# Altium PCB 3MotorDrivers.PcbDoc
Units mil, origin at the board's own origin, x right, y up, seen from the top; angles counter-clockwise.
Board outline 1098.88 x 2700 mil, 2 copper layers (Top Layer, Bottom Layer); 16 components, 38 nets, 94 pads, 6 vias.
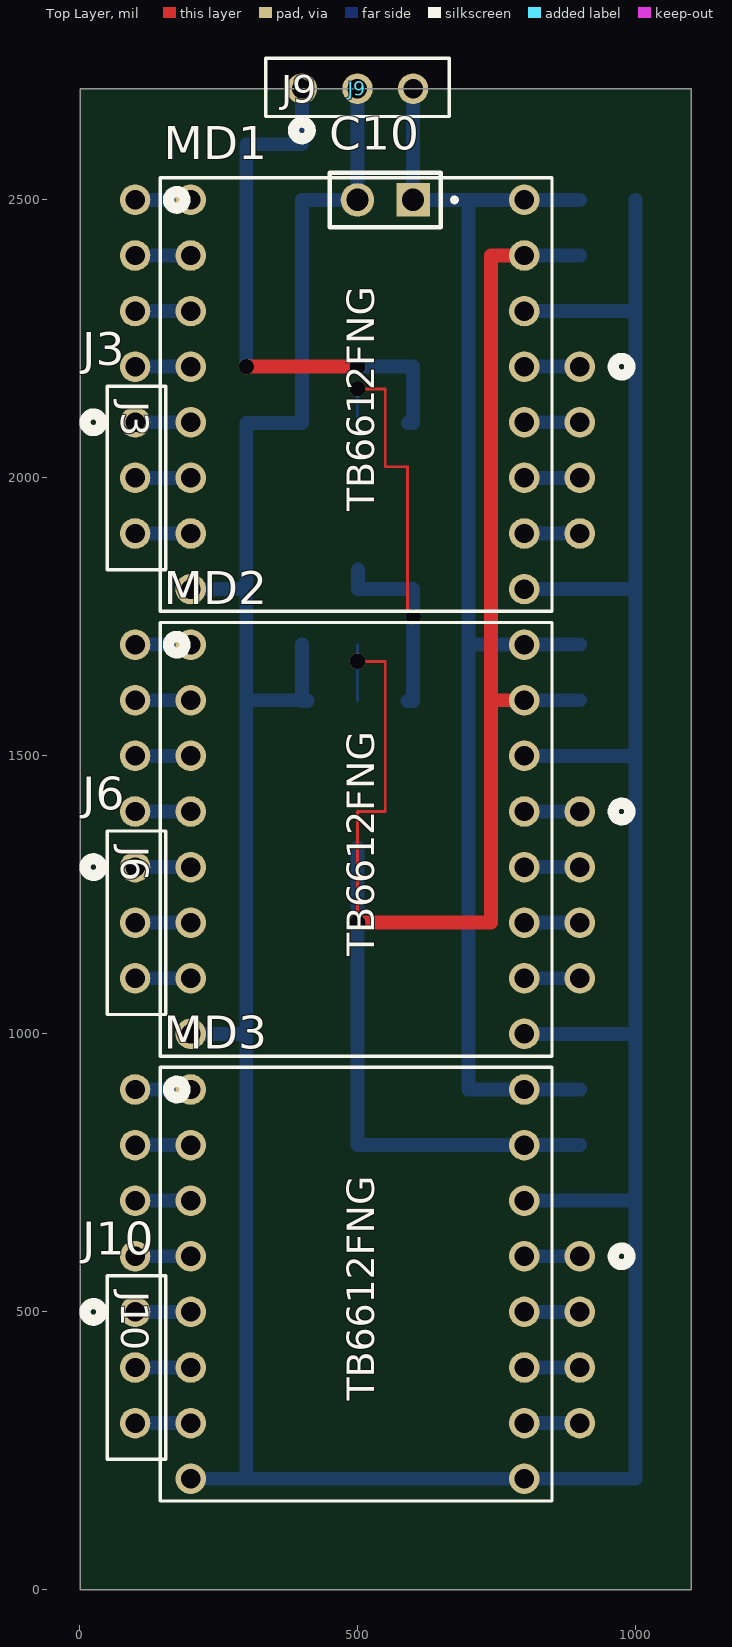
[diagram p0: Top Layer view]
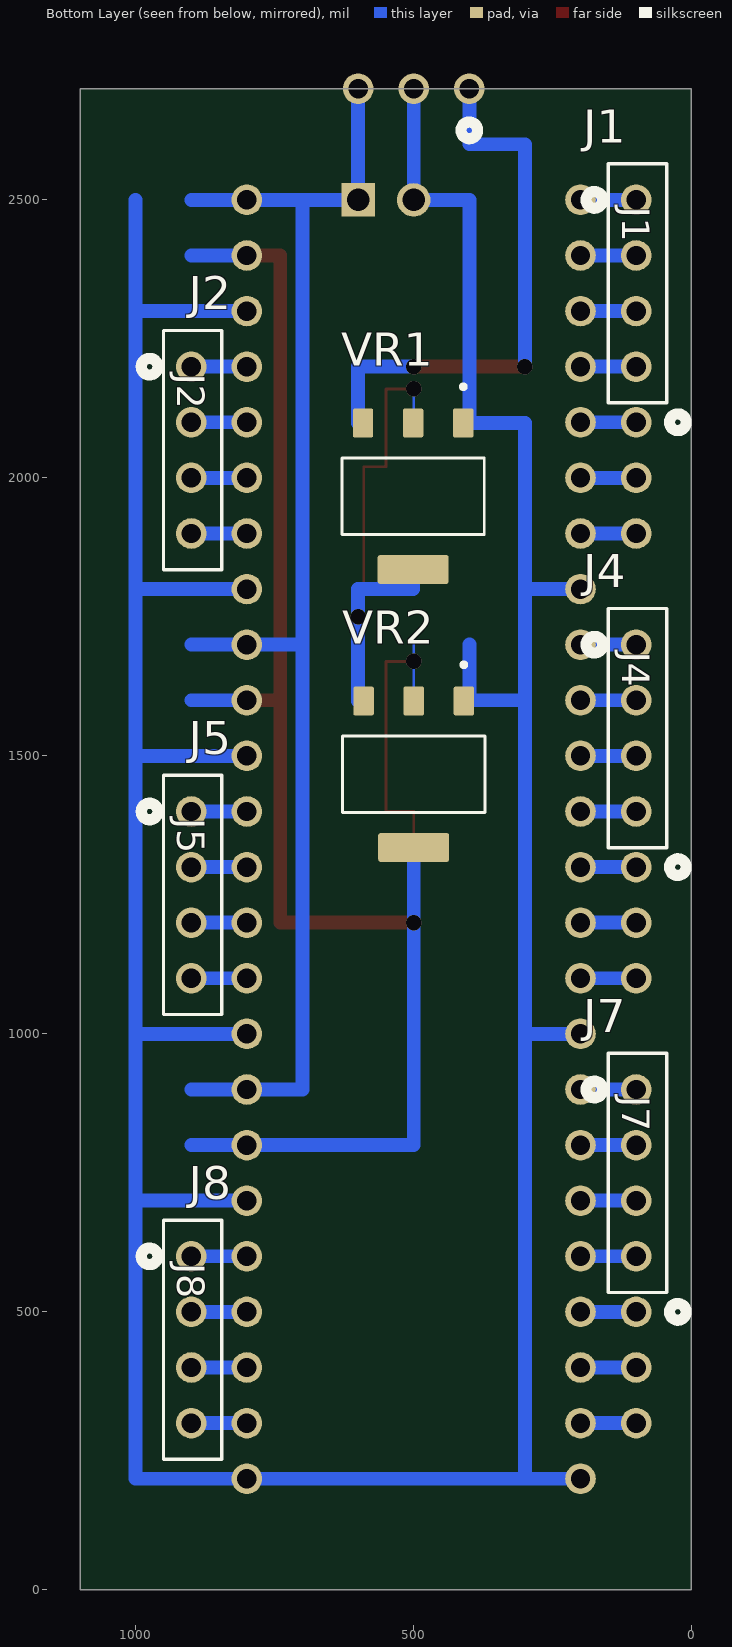
[diagram p1: Bottom Layer view, seen from below]
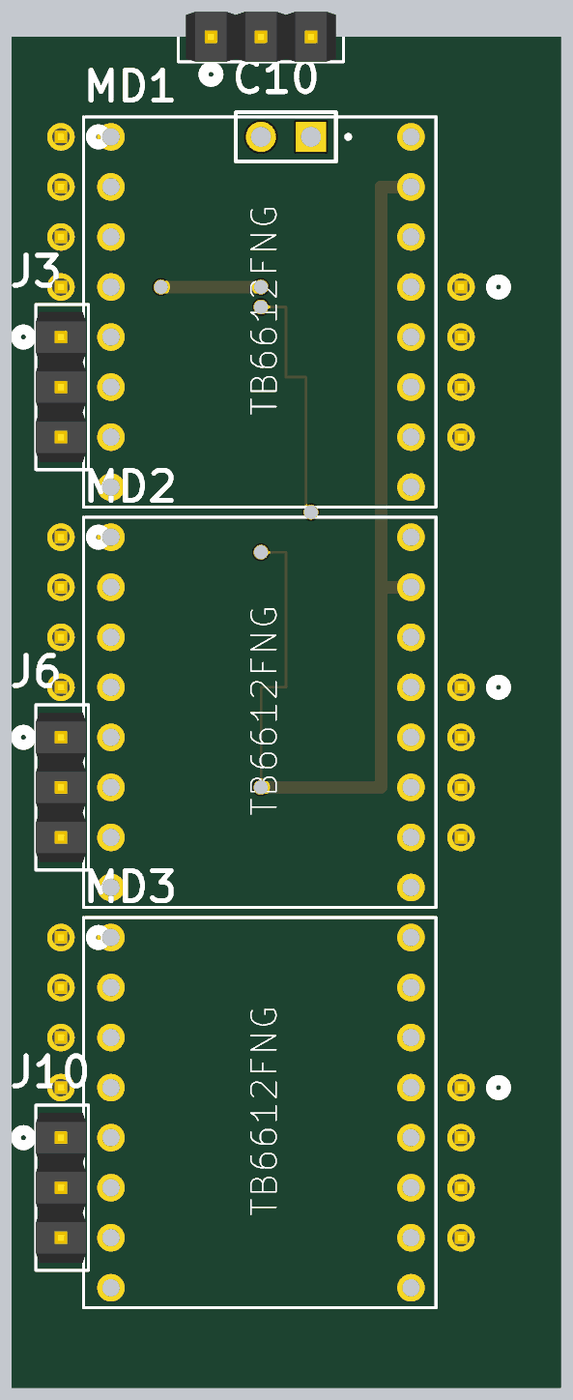
[diagram p2: 3D render of the assembled board from above, using the file's embedded part models]
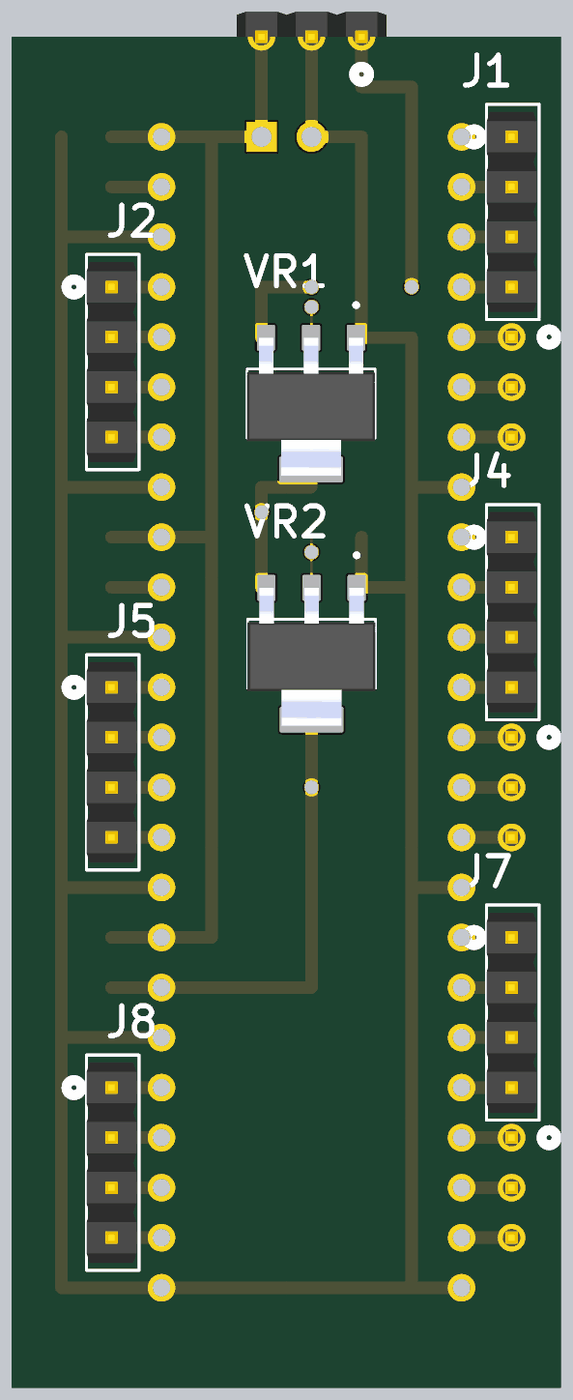
[diagram p3: 3D render of the assembled board from below, using the file's embedded part models]

## Layer stack, top to bottom
Top Solder: solder mask 0.4, Solder Resist, Dk 3.5
Top Layer: signal copper 1.4
Dielectric 1: dielectric 12.6, FR-4, Dk 4.8
Bottom Layer: signal copper 1.4
Bottom Solder: solder mask 0.4, Solder Resist, Dk 3.5

## Board outline
1.12,0 1.12,2700 1100,2700 1100,0

## Design rules (kind name [scope] priority, off if disabled: settings)
Clearance [All] p1: gap=3.94 ignorepadtopadclearanceinfootprint=FALSE
PolygonConnect [All] p1: connectstyle=Relief reliefconductorwidth=10 reliefentries=4 polygonreliefangle="90 Angle" airgapwidth=10
RoutingVias [All] p1: holewidth=28 width=50 viastyle="Through Hole" minholewidth=28 minwidth=50 maxholewidth=28 maxwidth=50
SolderMaskExpansion [All] p1: expansion=4 istentingtop=FALSE
SupplyNets "Schematic Supply Nets_1" [InNet('GND')] p1: voltage=0.000
SupplyNets "Schematic Supply Nets" [InNet('6V5')] p2: voltage=0.000
Width [All] p1: maxlimit=25 minlimit=5 preferedwidth=10
30 further rules are at their usual default settings.

## Components (designator, comment, footprint, x,y, rotation, side; value= is the part's Value field where it differs from the comment)
C10 "100uF" 47nF 550,2500 r0 top
J1 "HTSW-104-23-T-S" "4 POS" 100,2400 r270 bottom
J2 "HTSW-104-23-T-S" "4 POS" 900,2100 r270 bottom
J3 "3 Male Headers" "3 POS" 100,2000 r270 top
J4 "HTSW-104-23-T-S" "4 POS" 100,1600 r270 bottom
J5 "HTSW-104-23-T-S" "4 POS" 900,1300 r270 bottom
J6 "3 Male Headers" "3 POS" 100,1200 r270 top
J7 "HTSW-104-23-T-S" "4 POS" 100,800 r270 bottom
J8 "HTSW-104-23-T-S" "4 POS" 900,500 r270 bottom
J9 "3 Male Headers" "3 POS" 500,2700 r0 top
J10 "3 Male Headers" "3 POS" 100,400 r270 top
MD1 "TB6612FNG" TB6612FNG 200,2000 r0 top
MD2 "TB6612FNG" TB6612FNG 200,1200 r0 top
MD3 "TB6612FNG" TB6612FNG 200,400 r0 top
VR1 "5V" 3V3 501,1967 r270 bottom
VR2 "3V3" 3V3 500,1467 r270 bottom

## Footprints (in the part's own frame and the unit in brackets; to place one, negate y for a bottom-side part, rotate by r counter-clockwise, add the part's x,y. Pads: shape width x height; smd on the part's side, far side on the other; paste and mask are expansions set on the pad)
"3 POS" [mil]
  round 55 hole 35 paste-99999 mask+0: 1(-100,0) 2(0,0) 3(100,0)
  silkscreen extent -165,-90 165,55, body extent -150,-50 150,50, height 500
3V3 [mm]
  rrect15% 1.31x0.93 smd: 1(-3.345,2.29) 2(-3.345,0) 3(-3.345,-2.29)
  rrect15% 1.31x3.24 smd: 4(3.345,0)
  silkscreen extent -5.1,-3.25 1.75,3.25, body extent -3.34,-3.25 3.65,3.25, height 1.8
"4 POS" [mil]
  round 55 hole 35 paste-99999 mask+0: 1(-100,0) 2(0,0) 3(100,0) 4(200,0)
  silkscreen extent -165,-90 265,55, body extent -150,-50 250,50, height 500
47nF [mm]
  round 1.53 hole 1.02: 1(-1.27,0)
  rect 1.53x1.53 / inner round 1.53 / far side rect 1.53x1.53 hole 1.02: 2(1.27,0)
  silkscreen extent -2.54,-1.24 3.26,1.24
TB6612FNG [mil]
  round 55 hole 35 paste-99999 mask+0: 1(0,500) 2(0,400) 3(0,300) 4(0,200) 5(0,100) 6(0,0) 7(0,-100) 8(0,-200) 9(600,500) 10(600,400) 11(600,300) 12(600,200) 13(600,100) 14(600,0) 15(600,-100) 16(600,-200)
  silkscreen extent -55,-240 650,540

## Part data
C10: "Pin Header, Board-to-Board, Wire-to-Board, 2.54 mm, 1 Rows, 2 Contacts, Through Hole, HTSW Series", Manufacturer=Samtec, Manufacturer Lifecycle Status=PRODUCTION, Manufacturer Part Number=HTSW-102-16-T-S, Category="Board to Board Connectors", ComponentLink1Description=https://datasheet.octopart.com:443/HTSW-102-16-T-S-Samtec-datasheet-97084101.pdf?src-supplier=Samtec, ComponentLink1URL=https://datasheet.octopart.com:443/HTSW-102-16-T-S-Samtec-datasheet-97084101.pdf?src-supplier=Samtec, ComponentLink2Description=https://sigma.octopart.com:443/14433675/technical_drawing/Samtec-HTSW-102-16-T-S.pdf?src-supplier=Samtec, ComponentLink2URL=https://sigma.octopart.com:443/14433675/technical_drawing/Samtec-HTSW-102-16-T-S.pdf?src-supplier=Samtec, ComponentLink3Description=https://datasheet.octopart.com:443/HTSW-102-16-T-S-Samtec-datasheet-150856372.pdf?src-supplier=Sager+Electronics, ComponentLink3URL=https://datasheet.octopart.com:443/HTSW-102-16-T-S-Samtec-datasheet-150856372.pdf?src-supplier=Sager+Electronics, ComponentLink4Description=https://datasheet.octopart.com:443/HTSW-102-16-T-S-Samtec-datasheet-151455181.pdf?src-supplier=Sager+Electronics, ComponentLink4URL=https://datasheet.octopart.com:443/HTSW-102-16-T-S-Samtec-datasheet-151455181.pdf?src-supplier=Sager+Electronics, ComponentLink5Description=https://datasheet.octopart.com:443/HTSW-102-16-T-S-Samtec-datasheet-136646178.pdf?src-supplier=Electro+Sonic, ComponentLink5URL=https://datasheet.octopart.com:443/HTSW-102-16-T-S-Samtec-datasheet-136646178.pdf?src-supplier=Electro+Sonic, ComponentLink6Description=https://datasheet.octopart.com:443/HTSW-102-16-T-S-Samtec-datasheet-62107121.pdf?src-supplier=Farnell, ComponentLink6URL=https://datasheet.octopart.com:443/HTSW-102-16-T-S-Samtec-datasheet-62107121.pdf?src-supplier=Farnell, ComponentLink7Description=https://datasheet.octopart.com:443/HTSW-102-16-T-S-Samtec-datasheet-180249195.pdf?src-supplier=JRH+Electronics, ComponentLink7URL=https://datasheet.octopart.com:443/HTSW-102-16-T-S-Samtec-datasheet-180249195.pdf?src-supplier=JRH+Electronics, ComponentLink8Description=https://datasheet.octopart.com/HTSW-102-16-T-S-Samtec-datasheet-86818365.pdf, ComponentLink8URL=https://datasheet.octopart.com/HTSW-102-16-T-S-Samtec-datasheet-86818365.pdf, ComponentLink9Description=https://datasheet.octopart.com:443/HTSW-102-16-T-S-Samtec-datasheet-21214457.pdf?src-supplier=Newark, ComponentLink9URL=https://datasheet.octopart.com:443/HTSW-102-16-T-S-Samtec-datasheet-21214457.pdf?src-supplier=Newark, Contact Material=Bronze, Contact Plating=Tin, Gender=Male, Lead Pitch=2.54mm, Lifecycle Status=Production, Mounting Technology="Through Hole", Number of Contacts=2, Number of Rows=1, Packaging=Bulk, Pitch=2.54mm, Pricing="1=0.1485, 1000=0.06895, 5000=0.0494, 10000=0.0491, 20000=0.04881 (USD)", Radiation Hardening=No, REACH SVHC=No, RoHS=Compliant, Stock=2347, Supplier=Avnet, Supplier Part Number=HTSW-102-16-T-S, Termination=Solder
J1 J2 J4 J5 J7 J8: library part "4 POS", "4POS CONN HEADER VERT  2.54MM", Manufacturer=Samtec, Manufacturer Lifecycle Status=PRODUCTION, Supplier Part Number=612-HTSW-104-23-T-S-ND, Category="Board to Board Connectors", ComponentLink1Description=https://datasheet.octopart.com:443/HTSW-104-23-T-S-Samtec-datasheet-97084101.pdf?src-supplier=Samtec, ComponentLink1URL=https://datasheet.octopart.com:443/HTSW-104-23-T-S-Samtec-datasheet-97084101.pdf?src-supplier=Samtec, ComponentLink2Description=https://sigma.octopart.com:443/14433675/technical_drawing/Samtec-HTSW-104-23-T-S.pdf?src-supplier=Samtec, ComponentLink2URL=https://sigma.octopart.com:443/14433675/technical_drawing/Samtec-HTSW-104-23-T-S.pdf?src-supplier=Samtec, ComponentLink3Description=https://datasheet.octopart.com:443/HTSW-104-23-T-S-Samtec-datasheet-136646178.pdf?src-supplier=Electro+Sonic, ComponentLink3URL=https://datasheet.octopart.com:443/HTSW-104-23-T-S-Samtec-datasheet-136646178.pdf?src-supplier=Electro+Sonic, ComponentLink4Description=https://datasheet.octopart.com:443/HTSW-104-23-T-S-Samtec-datasheet-150856372.pdf?src-supplier=Electro+Sonic, ComponentLink4URL=https://datasheet.octopart.com:443/HTSW-104-23-T-S-Samtec-datasheet-150856372.pdf?src-supplier=Electro+Sonic, ComponentLink5Description=https://datasheet.octopart.com:443/HTSW-104-23-T-S-Samtec-datasheet-62107121.pdf?src-supplier=Farnell, ComponentLink5URL=https://datasheet.octopart.com:443/HTSW-104-23-T-S-Samtec-datasheet-62107121.pdf?src-supplier=Farnell, ComponentLink6Description=https://datasheet.octopart.com:443/HTSW-104-23-T-S-Samtec-datasheet-180249195.pdf?src-supplier=JRH+Electronics, ComponentLink6URL=https://datasheet.octopart.com:443/HTSW-104-23-T-S-Samtec-datasheet-180249195.pdf?src-supplier=JRH+Electronics, ComponentLink7Description=https://datasheet.octopart.com:443/HTSW-104-23-T-S-Samtec-datasheet-151455181.pdf?src-supplier=Sager+Electronics, ComponentLink7URL=https://datasheet.octopart.com:443/HTSW-104-23-T-S-Samtec-datasheet-151455181.pdf?src-supplier=Sager+Electronics, ComponentLink8Description=https://datasheet.octopart.com/HTSW-104-23-T-S-Samtec-datasheet-86818365.pdf, ComponentLink8URL=https://datasheet.octopart.com/HTSW-104-23-T-S-Samtec-datasheet-86818365.pdf, ComponentLink9Description=https://datasheet.octopart.com:443/HTSW-104-23-T-S-Samtec-datasheet-21214457.pdf?src-supplier=Newark, ComponentLink9URL=https://datasheet.octopart.com:443/HTSW-104-23-T-S-Samtec-datasheet-21214457.pdf?src-supplier=Newark, Contact Material=Bronze, Contact Plating=Tin, Gender=Male, Lead Pitch=2.54mm, Lifecycle Status=Production, Manufacturer Part Number=HTSW-104-23-T-S, Mounting Technology="Through Hole", Number of Contacts=4, Number of Rows=1, Packaging=Bulk, Pitch=2.54mm, Pricing="1=0.33 (USD)", Radiation Hardening=No, REACH SVHC=No, RoHS=Compliant, Supplier=DigiKey, Termination=Solder
J3 J6 J9 J10: library part "3 POS", "CONN HEADER VERT 3POS 1.27MM", LCSC Part Number=C6253705, Manufacturer=Samtec, Manufacturer Lifecycle Status=PRODUCTION, Manufacturer Part Number=FTS-103-01-L-S, Supplier Part Number=SAM15177-ND, Category="Headers and Wire Housings", ComponentLink1Description=https://datasheet.octopart.com:443/FTS-103-01-L-S-Samtec-datasheet-97029283.pdf?src-supplier=Newark, ComponentLink1URL=https://datasheet.octopart.com:443/FTS-103-01-L-S-Samtec-datasheet-97029283.pdf?src-supplier=Newark, ComponentLink2Description=https://sigma.octopart.com:443/97029285/technical_drawing/Samtec-FTS-103-01-L-S.pdf?src-supplier=Newark, ComponentLink2URL=https://sigma.octopart.com:443/97029285/technical_drawing/Samtec-FTS-103-01-L-S.pdf?src-supplier=Newark, ComponentLink3Description=https://datasheet.octopart.com:443/FTS-103-01-L-S-Samtec-datasheet-118493358.pdf?src-supplier=Electro+Sonic, ComponentLink3URL=https://datasheet.octopart.com:443/FTS-103-01-L-S-Samtec-datasheet-118493358.pdf?src-supplier=Electro+Sonic, ComponentLink4Description=https://datasheet.octopart.com:443/FTS-103-01-L-S-Samtec-datasheet-165596534.pdf?src-supplier=JRH+Electronics, ComponentLink4URL=https://datasheet.octopart.com:443/FTS-103-01-L-S-Samtec-datasheet-165596534.pdf?src-supplier=JRH+Electronics, ComponentLink5Description=https://datasheet.octopart.com:443/FTS-103-01-L-S-Samtec-datasheet-176663378.pdf?src-supplier=Toby+Electronics, ComponentLink5URL=https://datasheet.octopart.com:443/FTS-103-01-L-S-Samtec-datasheet-176663378.pdf?src-supplier=Toby+Electronics, ComponentLink6Description=https://datasheet.octopart.com:443/FTS-103-01-L-S-Samtec-datasheet-116535195.pdf?src-supplier=Toby+Electronics, ComponentLink6URL=https://datasheet.octopart.com:443/FTS-103-01-L-S-Samtec-datasheet-116535195.pdf?src-supplier=Toby+Electronics, ComponentLink7Description=https://datasheet.octopart.com:443/FTS-103-01-L-S-Samtec-datasheet-136395376.pdf?src-supplier=Toby+Electronics, ComponentLink7URL=https://datasheet.octopart.com:443/FTS-103-01-L-S-Samtec-datasheet-136395376.pdf?src-supplier=Toby+Electronics, ComponentLink8Description=https://datasheet.octopart.com:443/FTS-103-01-L-S-Samtec-datasheet-151470456.pdf?src-supplier=Sager+Electronics, ComponentLink8URL=https://datasheet.octopart.com:443/FTS-103-01-L-S-Samtec-datasheet-151470456.pdf?src-supplier=Sager+Electronics, Contact Plating=Gold, Gender=Male, Lifecycle Status=Production, Mounting Technology="Through Hole", Number of Contacts=3, Number of Rows=1, Packaging=Bulk, Pitch=1.27mm, Pricing="1=0.85, 50=0.7444, 100=0.6307, 500=0.5244, 1000=0.4479, 2000=0.36622, 5000=0.34448 (USD)", Radiation Hardening=No, RoHS=Compliant, Stock=1795, Supplier=DigiKey, Termination=Solder
MD1 MD2 MD3: "Strip Terminal Block, 8A, 0.5mm2, 1 Row(s), 1 Deck(s)", Color=Black, Contact Resistance=1.8mΩ, Current=10A, Current Rating=8A, Flammability Rating="UL94 V-0", Manufacturer="Phoenix Contact", Manufacturer Lifecycle Status=AVAILABLE, Manufacturer Part Number=1945151, Max Current Rating=6A, Supplier Part Number=651-1945151, Voltage=300V, Voltage Rating=160V, Approvals=UL, Category="Terminal Blocks", China RoHS=Compliant, ComponentLink1Description=https://datasheet.octopart.com:443/1945151-Phoenix-Contact-datasheet-66579491.pdf?src-supplier=element14+APAC, ComponentLink1URL=https://datasheet.octopart.com:443/1945151-Phoenix-Contact-datasheet-66579491.pdf?src-supplier=element14+APAC, ComponentLink2Description=https://datasheet.octopart.com:443/PST-1.0/8-3.5-Phoenix-Contact-datasheet-8822167.pdf?src-supplier=element14+APAC, ComponentLink2URL=https://datasheet.octopart.com:443/PST-1.0/8-3.5-Phoenix-Contact-datasheet-8822167.pdf?src-supplier=element14+APAC, ComponentLink3Description=https://datasheet.octopart.com:443/1945151-Phoenix-Contact-datasheet-175456693.pdf?src-supplier=Master+Electronics, ComponentLink3URL=https://datasheet.octopart.com:443/1945151-Phoenix-Contact-datasheet-175456693.pdf?src-supplier=Master+Electronics, ComponentLink4Description=https://datasheet.octopart.com:443/1945151-Phoenix-Contact-datasheet-154783991.pdf?src-supplier=Electro+Sonic, ComponentLink4URL=https://datasheet.octopart.com:443/1945151-Phoenix-Contact-datasheet-154783991.pdf?src-supplier=Electro+Sonic, ComponentLink5Description=https://datasheet.octopart.com:443/1945151-Phoenix-Contact-datasheet-33525158.pdf?src-supplier=MRO+Stop, ComponentLink5URL=https://datasheet.octopart.com:443/1945151-Phoenix-Contact-datasheet-33525158.pdf?src-supplier=MRO+Stop, ComponentLink6Description=https://datasheet.octopart.com:443/1945151-Phoenix-Contact-datasheet-164875081.pdf?src-supplier=Burklin+Elektronik, ComponentLink6URL=https://datasheet.octopart.com:443/1945151-Phoenix-Contact-datasheet-164875081.pdf?src-supplier=Burklin+Elektronik, ComponentLink7Description=https://datasheet.octopart.com:443/1945151-Phoenix-Contact-datasheet-54101.pdf?src-supplier=DigiKey, ComponentLink7URL=https://datasheet.octopart.com:443/1945151-Phoenix-Contact-datasheet-54101.pdf?src-supplier=DigiKey, ComponentLink8Description=https://datasheet.octopart.com:443/1945151-Phoenix-Contact-datasheet-94777.pdf?src-supplier=RS+(Formerly+Allied+Electronics), ComponentLink8URL=https://datasheet.octopart.com:443/1945151-Phoenix-Contact-datasheet-94777.pdf?src-supplier=RS+(Formerly+Allied+Electronics), ComponentLink9Description=https://datasheet.octopart.com:443/1945151-Phoenix-Contact-datasheet-62084791.pdf?src-supplier=RS+(Formerly+Allied+Electronics), ComponentLink9URL=https://datasheet.octopart.com:443/1945151-Phoenix-Contact-datasheet-62084791.pdf?src-supplier=RS+(Formerly+Allied+Electronics), ComponentLink10Description=http://sigma.octopart.com:80/195219851/materials_sheet/Phoenix-Contact-1945151.pdf?src-supplier=Compliance+Statements, ComponentLink10URL=http://sigma.octopart.com:80/195219851/materials_sheet/Phoenix-Contact-1945151.pdf?src-supplier=Compliance+Statements, Contact Plating=Tin, Country of Origin=Germany, Depth=2.8mm, Export Control Classification Number (ECCN) Code=EAR99, Harmonized Tariff Schedule (HTS) Code=8536.90.40.00, Housing Color=Black, Introduction Date=2002-11-26, Lead Free="Lead Free", Lifecycle Status=Production, Mounting Technology=Solder, Number of Contacts=8, Number of Levels=1, Number of Positions=8, Number of Positions Per Level=8, Number of Rows=1, Orientation=Straight, Packaging=Bulk, Pins=8, Pitch=3.5mm, Pricing="1=0.76, 10=0.76, 50=0.76, 100=0.76, 1000=0.76, 10000=0.76 (USD)", REACH SVHC=Unaffected, RoHS=Compliant, Stock=5397, Supplier=Mouser, Termination=Solder, Weight=869.990166mg, Width=24.5mm, Wire/Cable Gauge=20AWG
VR1 VR2: "10mA positive electrode fixed 3.3V 15V 6mV SOT-223 SMD mount 3.71mm(width)*1.8mm(height)", Case/Package=SOT-223-3, Dropout Voltage=1.1V, Manufacturer="Analog Devices", Manufacturer Lifecycle Status=PRODUCTION, Manufacturer Part Number=LT1117CST-3.3#PBF, Max Operating Temperature=125°C, Max Output current=800mA, Max Supply Voltage=15V, Min Input Voltage=2.45V, Min Operating Temperature=0°C, Nominal Output Voltage=3.3V, Operating Supply Current=5mA, Output Voltage Accuracy=1%, Power Supply Rejection Ratio (PSRR)=75dB, Quiescent Current=10mA, Reference Voltage=1.27V, Supplier Part Number=505-LT1117CST-3.3#PBF-ND, Category="LDO Voltage Regulators", ComponentLink1Description=https://datasheet.octopart.com:443/LT1117CST-3.3%23PBF-Analog-Devices-datasheet-10688060.pdf?src-supplier=element14+APAC, ComponentLink1URL=https://datasheet.octopart.com:443/LT1117CST-3.3%23PBF-Analog-Devices-datasheet-10688060.pdf?src-supplier=element14+APAC, ComponentLink2Description=https://octopart.com:443/opatz8j6/c1?t=sxPfvuRhnwazmxrmq8OcozQ_deCTcj93l61TCwHHAMrfHd1zMJUbDN1BQRyopVTPT06EZltW9au6ThzHazGz_K01nYGgQQbAqUW7xZoQbMQj_Tk9mo54BoGqI58goAQNKChcZH57xe3yJR3CLvqjnZIhvnC6ZUnXmbxCUgfO7NVBhd06IAa9UBMTy5__Do4QRO1H7gN19Bt_59SFkSqeidpjLdGkU2gnUhcEunfk7eyIcREwc1Qh4I3mNFWWaQ5DTh2xZX-NMPM0Sc5KZLLtUjKhzoxxlKwGl3cc6mUQ8r87b7CLjsspdA&src-supplier=Analog+Devices, ComponentLink2URL=https://octopart.com:443/opatz8j6/c1?t=sxPfvuRhnwazmxrmq8OcozQ_deCTcj93l61TCwHHAMrfHd1zMJUbDN1BQRyopVTPT06EZltW9au6ThzHazGz_K01nYGgQQbAqUW7xZoQbMQj_Tk9mo54BoGqI58goAQNKChcZH57xe3yJR3CLvqjnZIhvnC6ZUnXmbxCUgfO7NVBhd06IAa9UBMTy5__Do4QRO1H7gN19Bt_59SFkSqeidpjLdGkU2gnUhcEunfk7eyIcREwc1Qh4I3mNFWWaQ5DTh2xZX-NMPM0Sc5KZLLtUjKhzoxxlKwGl3cc6mUQ8r87b7CLjsspdA&src-supplier=Analog+Devices, ComponentLink3Description=https://datasheet.octopart.com:443/LT1117CST-3.3%23PBF-Linear-Technology-datasheet-501865.pdf?src-supplier=element14, ComponentLink3URL=https://datasheet.octopart.com:443/LT1117CST-3.3%23PBF-Linear-Technology-datasheet-501865.pdf?src-supplier=element14, ComponentLink4Description=https://datasheet.octopart.com:443/LT1117CST-3.3%23PBF-Analog-Devices-datasheet-11554267.pdf?src-supplier=SOS+electronic, ComponentLink4URL=https://datasheet.octopart.com:443/LT1117CST-3.3%23PBF-Analog-Devices-datasheet-11554267.pdf?src-supplier=SOS+electronic, ComponentLink5Description=https://sigma.octopart.com:443/57690395/technical_drawing/Linear-Technology-LT1117CST-3.3%23PBF.pdf?src-supplier=Linear+Technology, ComponentLink5URL=https://sigma.octopart.com:443/57690395/technical_drawing/Linear-Technology-LT1117CST-3.3%23PBF.pdf?src-supplier=Linear+Technology, ComponentLink6Description=https://datasheet.octopart.com:443/LT1117CST-3.3%23PBF-Linear-Technology-datasheet-8209746.pdf?src-supplier=Jameco+(USA), ComponentLink6URL=https://datasheet.octopart.com:443/LT1117CST-3.3%23PBF-Linear-Technology-datasheet-8209746.pdf?src-supplier=Jameco+(USA), ComponentLink7Description=http://sigma.octopart.com:80/conflict_mineral_statement/Analog-Devices-company-33.pdf?src-supplier=Compliance+Statements, ComponentLink7URL=http://sigma.octopart.com:80/conflict_mineral_statement/Analog-Devices-company-33.pdf?src-supplier=Compliance+Statements, ComponentLink8Description=https://octopart.com:443/opatz8j6/c1?t=Itd0_Rzn44atCgyqqsaW9vqyNROmcDdOOlmDNuHQy5sG6RlJFqPrF18Q09GdkdA4DnnOnQyFiKa-xTy84isrbvQcKhyHdREctLTuDeXElH90lmN1SFw106Zq8a491SeXECFg075oa3RZHoUhm261CrSHgUqgifs4IJe2bcS4VG6cTp0XbT4a9-5BFrudppU15yqarzS6nzIestfbH4UNq1eEbTliTQbkkowoZRDFvmMPpk22GyonWMwg9GqKAKAtjcwvRjM6GvyXDZLmJkvlZxPaACvllw-u3xX1LKWDQgG40xXiC5YhaA&src-supplier=Compliance+Statements, ComponentLink8URL=https://octopart.com:443/opatz8j6/c1?t=Itd0_Rzn44atCgyqqsaW9vqyNROmcDdOOlmDNuHQy5sG6RlJFqPrF18Q09GdkdA4DnnOnQyFiKa-xTy84isrbvQcKhyHdREctLTuDeXElH90lmN1SFw106Zq8a491SeXECFg075oa3RZHoUhm261CrSHgUqgifs4IJe2bcS4VG6cTp0XbT4a9-5BFrudppU15yqarzS6nzIestfbH4UNq1eEbTliTQbkkowoZRDFvmMPpk22GyonWMwg9GqKAKAtjcwvRjM6GvyXDZLmJkvlZxPaACvllw-u3xX1LKWDQgG40xXiC5YhaA&src-supplier=Compliance+Statements, Height=1.8mm, Lead Free="Lead Free", Length=6.71mm, Lifecycle Status=Production, Min Current Limit=800mA, Mounting Technology="Surface Mount", Number of Channels=1, Number of Outputs=1, Number of Regulators=1, Output Current=800mA, Output Type=Fixed, Output Voltage=3.3V, Packaging=Bulk, Pins=3, Polarity=Positive, Pricing="1=7.96, 10=6.16, 78=5.28808, 156=5.09051, 312=4.92788, 546=4.81782, 1014=4.71464 (USD)", Radiation Hardening=No, REACH SVHC=Unaffected, RoHS=Compliant, Schedule B="8542390000, 8542390000|8542390000|8542390000|8542390000|8542390000|8542390000|8542390000|8542390000|8542390000|8542390000|8542390000|8542390000|8542390000|8542390000|8542390000|8542390000|8542390000|8542390000|8542390000|8542390000|8542390000|8542390000|8542390000|85", Stock=5446, Supplier=DigiKey, Width=3.71mm

## Via types
v1: diameter 28, hole 28, Top Layer to Bottom Layer, 6 vias

## Nets (pads, with @x,y where several pads share a name; then routed paths per layer and width w, separated by ;. In a path a pad name is that pad's centre, name@x,y a point inside that pad or via, vN(x,y) a via of type N, cw(c..) or ccw(c..) an arc to the next point about the centre after c; other vN are vias at no path point)
3V3_OUT: MD1.10 MD2.10 MD3.10 VR2.2 VR2.4 | length 3366.6
  Top Layer w5: v1(500,1200) 500,1400 550,1400 550,1670 v1(500,1670)
  Top Layer w25: v1(500,1200) 740,1200 740,1600 ; MD2.10 740,1600 ; MD1.10 740,2400 740,1600
  Bottom Layer w5: VR2.2 v1(500,1670) 500,1700
  Bottom Layer w25: VR2.4 v1(500,1200) 500,800 MD3.10 900,800 ; MD2.10 900,1600 ; MD1.10 900,2400
6V5: J9.1 VR1.3 | length 1010.1
  Top Layer w25: v1(300,2200) v1(500,2200)
  Bottom Layer w25: v1(300,2200) 300,2600 400,2600 J9.1 ; v1(500,2200) 600,2200 600,2098.69 VR1.3
GND: C10.1 J9.2 MD1.8 MD1.11 MD1.16 MD2.8 MD2.11 MD2.16 MD3.8 MD3.11 MD3.16 VR1.1 VR2.1 | length 7222.3
  Bottom Layer w25: MD3.8 300,200 ; MD2.8 300,1000 ; MD1.8 300,1800 ; 400,1700 400,1598.69 VR2.1 409.84,1600 300,1600 ; J9.2 C10.1 400,2500 400,2098.69 300,2098.69 300,1800 ; MD3.11 1000,700 ; MD2.16 1000,1000 ; MD2.11 1000,1500 ; MD1.16 1000,1800 ; MD1.11 1000,2300 ; 1000,2500 1000,2300 ; 300,200 300,1000 ; 300,200 MD3.16 1000,200 1000,700 ; 300,1000 300,1600 ; 300,1600 300,1800 ; 1000,700 1000,1000 ; 1000,1000 1000,1500 ; 1000,1500 1000,1800 ; 1000,1800 1000,2300
NetJ1_1: J1.1 MD1.1 | length 100
  Bottom Layer w25: J1.1 MD1.1
NetJ1_2: J1.2 MD1.2 | length 100
  Bottom Layer w25: J1.2 MD1.2
NetJ1_3: J1.3 MD1.3 | length 100
  Bottom Layer w25: J1.3 MD1.3
NetJ1_4: J1.4 MD1.4 | length 100
  Bottom Layer w25: J1.4 MD1.4
NetJ2_1: J2.1 MD1.12 | length 100
  Bottom Layer w25: MD1.12 J2.1
NetJ2_2: J2.2 MD1.13 | length 100
  Bottom Layer w25: MD1.13 J2.2
NetJ2_3: J2.3 MD1.14 | length 100
  Bottom Layer w25: MD1.14 J2.3
NetJ2_4: J2.4 MD1.15 | length 100
  Bottom Layer w25: MD1.15 J2.4
NetJ3_1: J3.1 MD1.5 | length 100
  Bottom Layer w25: J3.1 MD1.5
NetJ3_2: J3.2 MD1.6 | length 100
  Bottom Layer w25: J3.2 MD1.6
NetJ3_3: J3.3 MD1.7 | length 100
  Bottom Layer w25: J3.3 MD1.7
NetJ4_1: J4.1 MD2.1 | length 100
  Bottom Layer w25: J4.1 MD2.1
NetJ4_2: J4.2 MD2.2 | length 100
  Bottom Layer w25: J4.2 MD2.2
NetJ4_3: J4.3 MD2.3 | length 100
  Bottom Layer w25: J4.3 MD2.3
NetJ4_4: J4.4 MD2.4 | length 100
  Bottom Layer w25: J4.4 MD2.4
NetJ5_1: J5.1 MD2.12 | length 100
  Bottom Layer w25: MD2.12 J5.1
NetJ5_2: J5.2 MD2.13 | length 100
  Bottom Layer w25: MD2.13 J5.2
NetJ5_3: J5.3 MD2.14 | length 100
  Bottom Layer w25: MD2.14 J5.3
NetJ5_4: J5.4 MD2.15 | length 100
  Bottom Layer w25: MD2.15 J5.4
NetJ6_1: J6.1 MD2.5 | length 100
  Bottom Layer w25: J6.1 MD2.5
NetJ6_2: J6.2 MD2.6 | length 100
  Bottom Layer w25: J6.2 MD2.6
NetJ6_3: J6.3 MD2.7 | length 100
  Bottom Layer w25: J6.3 MD2.7
NetJ7_1: J7.1 MD3.1 | length 100
  Bottom Layer w25: J7.1 MD3.1
NetJ7_2: J7.2 MD3.2 | length 100
  Bottom Layer w25: J7.2 MD3.2
NetJ7_3: J7.3 MD3.3 | length 100
  Bottom Layer w25: J7.3 MD3.3
NetJ7_4: J7.4 MD3.4 | length 100
  Bottom Layer w25: J7.4 MD3.4
NetJ8_1: J8.1 MD3.12 | length 100
  Bottom Layer w25: MD3.12 J8.1
NetJ8_2: J8.2 MD3.13 | length 100
  Bottom Layer w25: MD3.13 J8.2
NetJ8_3: J8.3 MD3.14 | length 100
  Bottom Layer w25: MD3.14 J8.3
NetJ8_4: J8.4 MD3.15 | length 100
  Bottom Layer w25: MD3.15 J8.4
NetJ10_1: J10.1 MD3.5 | length 100
  Bottom Layer w25: J10.1 MD3.5
NetJ10_2: J10.2 MD3.6 | length 100
  Bottom Layer w25: J10.2 MD3.6
NetJ10_3: J10.3 MD3.7 | length 100
  Bottom Layer w25: J10.3 MD3.7
NetVR1_2: VR1.2 VR1.4 VR2.3 | length 917.8
  Top Layer w5: v1(500,2160) 550,2160 550,2020 590,2020 590,1750 v1(600,1750)
  Bottom Layer w5: v1(500,2160) 500,2098.69 VR1.2
  Bottom Layer w25: VR1.4 501,1800 600,1800 v1(600,1750) 600,1598.69 VR2.3
VM: C10.2 J9.3 MD1.9 MD2.9 MD3.9 | length 2500
  Bottom Layer w25: J9.3 C10.2 700,2500 ; 900,900 MD3.9 700,900 700,1700 ; 900,1700 MD2.9 700,1700 ; 900,2500 MD1.9 700,2500 ; 700,1700 700,2500

## Silkscreen, mask and mechanical layers (free items; w line width, h text height)
Mechanical 1:
  the board outline again, w10